# Altium PCB QuarterBridge_RevK.PcbDoc (part 2 of 2)
Units mil, origin at the board's own origin, x right, y up, seen from the top; angles counter-clockwise.
Board outline 3307.09 x 2165.35 mil, 2 copper layers (Top Layer, Bottom Layer), stack 62.992 mil thick; 54 components, 68 nets, 232 pads, 62 vias.
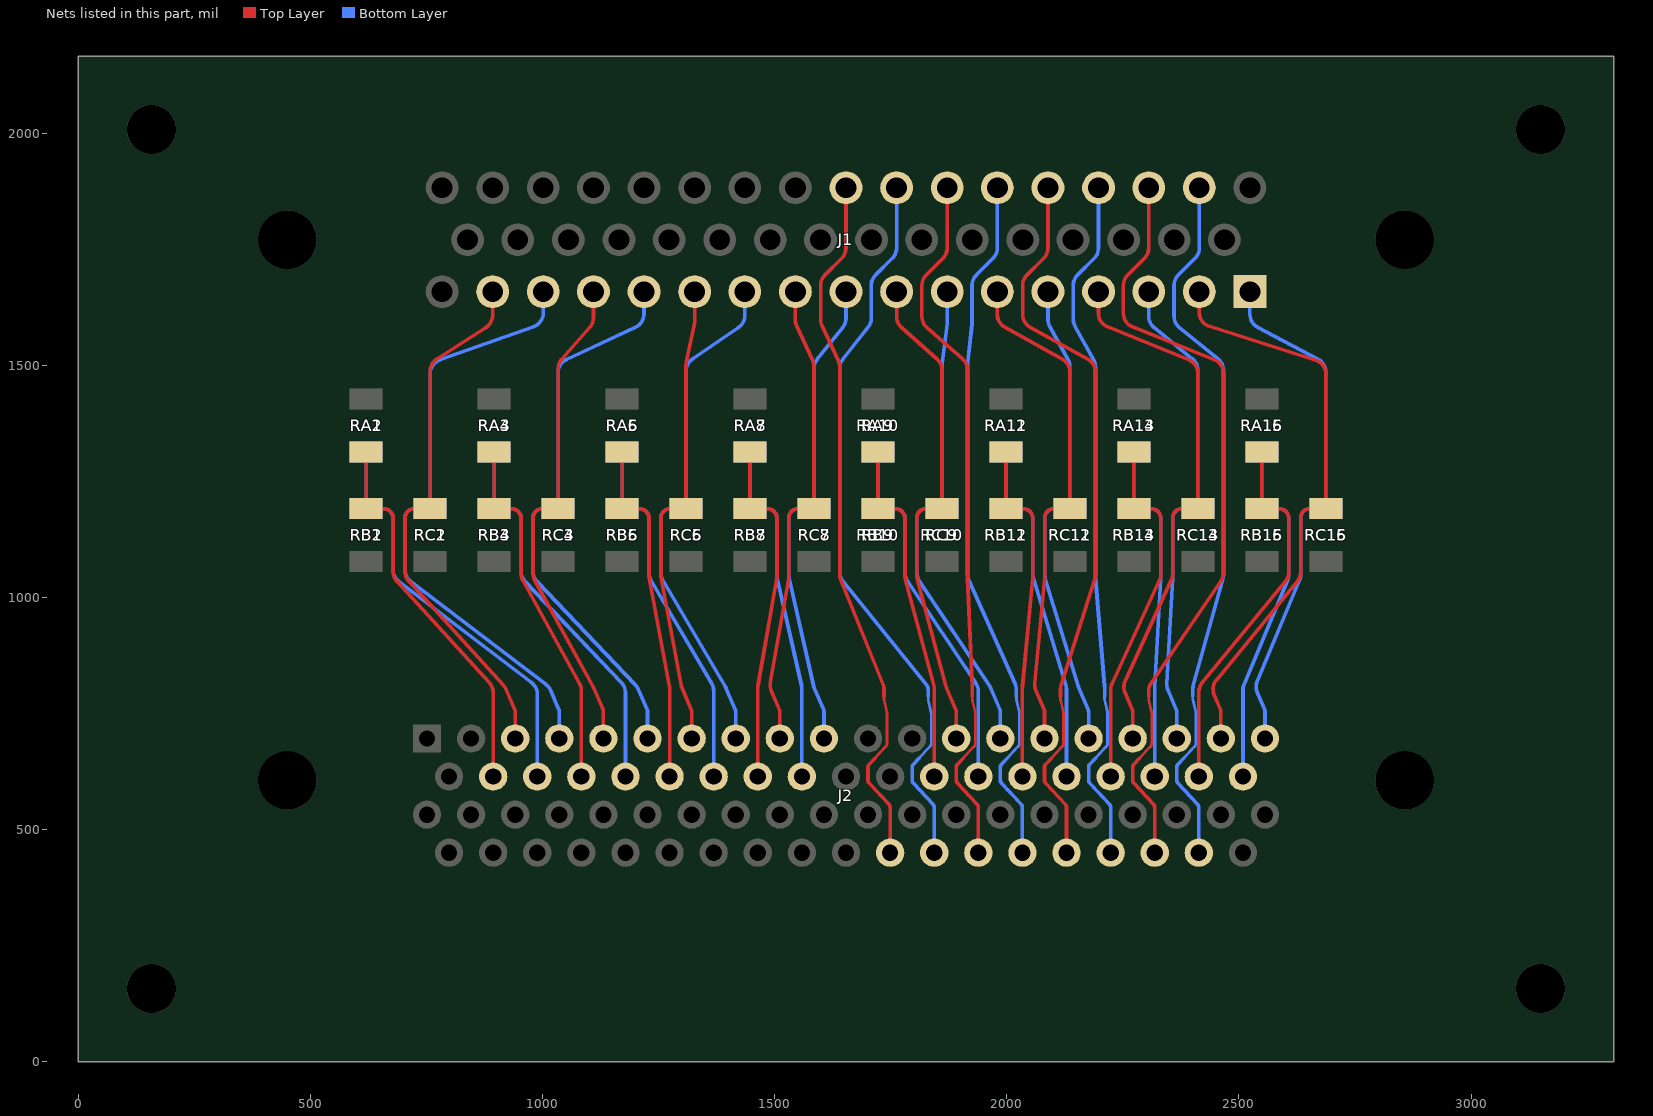
[diagram p2: the nets of this part, all layers, seen from the top]

## Via types
v1: diameter 23.62, hole 11.81, Top Layer to Bottom Layer, tented both sides, 58 vias
v2: diameter 19.68, hole 9.84, Top Layer to Bottom Layer, tented both sides, 4 vias

## Nets (pads, with @x,y where several pads share a name; then routed paths per layer and width w, separated by ;. In a path a pad name is that pad's centre, name@x,y a point inside that pad or via, vN(x,y) a via of type N, cw(c..) or ccw(c..) an arc to the next point about the centre after c; other vN are vias at no path point) (continued)
PS+_09: J1.42 J2.70 | length 1513.3
  Top Layer w5.91: 1715.9,653.54 1739.21,678.26 ccw(c1732.05,685.01) 1741.9,685.01 1741.9,750.85 ccw(c1732.05,750.85) 1741.65,753.06 1735.8,778.44 cw(c1745.39,780.65) 1735.55,780.65 1735.55,787.4
  Top Layer w7.87: J1.42@1653.54,1882.35 1653.54,1752.59 cw(c1622.05,1752.59) 1644.32,1730.31 1608.27,1694.26 ccw(c1630.54,1671.99) 1599.04,1671.99 1599.04,1597.59 ccw(c1630.54,1597.59) 1602.04,1584.19 1636.77,1510.3 cw(c1608.27,1496.9) 1639.76,1496.9 1639.76,1049.45 ccw(c1671.26,1049.45) 1642.07,1037.61 1733.24,812.78 cw(c1704.06,800.94) 1735.55,800.94 1735.55,787.4 ; 1715.9,653.54 1703.73,640.64 ccw(c1710.89,633.89) 1701.04,633.89 1701.04,606.23 ccw(c1710.89,606.23) 1703.67,599.53 1745.92,554.01 cw(c1738.7,547.32) 1748.54,547.32 J2.70@1748.54,450
PS+_10: J1.41 J2.71 | length 1574.4
  Bottom Layer w5.91: 1810.9,653.54 1834.21,678.26 ccw(c1827.05,685.01) 1836.9,685.01 1836.9,750.85 ccw(c1827.05,750.85) 1836.65,753.06 1830.8,778.44 cw(c1840.39,780.65) 1830.55,780.65 1830.55,787.4
  Bottom Layer w7.87: J1.41@1762.54,1882.35 1762.54,1752.59 cw(c1731.05,1752.59) 1753.32,1730.31 1717.27,1694.26 ccw(c1739.54,1671.99) 1708.04,1671.99 1708.04,1601.47 cw(c1676.55,1601.47) 1701.28,1581.97 1646.53,1512.51 ccw(c1671.26,1493.02) 1639.76,1493.02 1639.76,1054.44 ccw(c1671.26,1054.44) 1646.76,1034.65 1826.1,812.6 cw(c1810.5,800) 1830.55,800 1830.55,787.4 ; 1810.9,653.54 1798.73,640.64 ccw(c1805.89,633.89) 1796.04,633.89 1796.04,606.23 ccw(c1805.89,606.23) 1798.67,599.53 1840.92,554.01 cw(c1833.7,547.32) 1843.54,547.32 J2.71@1843.54,450
PS+_11: J1.40 J2.72 | length 1527.5
  Top Layer w5.91: 1905.9,653.54 1929.21,678.26 ccw(c1922.05,685.01) 1931.9,685.01 1931.9,750.85 ccw(c1922.05,750.85) 1931.65,753.06 1925.8,778.44 cw(c1935.39,780.65) 1925.55,780.65 1925.55,787.4
  Top Layer w7.87: J1.40@1871.54,1882.35 1871.54,1752.59 cw(c1840.05,1752.59) 1862.32,1730.31 1826.27,1694.26 ccw(c1848.54,1671.99) 1817.04,1671.99 1817.04,1604.78 ccw(c1848.54,1604.78) 1827.72,1581.15 1904.68,1513.34 cw(c1883.86,1489.71) 1915.35,1489.71 1915.35,1043.99 ccw(c1946.85,1043.99) 1915.38,1042.63 1925.52,807.77 cw(c1894.06,806.41) 1925.55,806.41 1925.55,787.4 ; 1905.9,653.54 1893.73,640.64 ccw(c1900.89,633.89) 1891.04,633.89 1891.04,606.23 ccw(c1900.89,606.23) 1893.67,599.53 1935.92,554.01 cw(c1928.7,547.32) 1938.54,547.32 J2.72@1938.54,450
PS+_12: J1.39 J2.73 | length 1508.8
  Bottom Layer w5.91: 2000.9,653.54 2024.21,678.26 ccw(c2017.05,685.01) 2026.9,685.01 2026.9,750.85 ccw(c2017.05,750.85) 2026.65,753.06 2020.8,778.44 cw(c2030.39,780.65) 2020.55,780.65 2020.55,787.4
  Bottom Layer w7.87: J1.39@1979.54,1882.35 1979.54,1752.59 cw(c1948.05,1752.59) 1970.32,1730.31 1934.27,1694.26 ccw(c1956.54,1671.99) 1925.04,1671.99 1925.04,1592.31 cw(c1893.55,1592.31) 1924.85,1588.81 1915.55,1505.68 ccw(c1946.85,1502.18) 1915.35,1502.18 1915.35,1050 ccw(c1946.85,1050) 1918.08,1037.19 2017.83,813.2 cw(c1989.06,800.39) 2020.55,800.39 2020.55,787.4 ; 2000.9,653.54 1988.73,640.64 ccw(c1995.89,633.89) 1986.04,633.89 1986.04,606.23 ccw(c1995.89,606.23) 1988.67,599.53 2030.92,554.01 cw(c2023.7,547.32) 2033.54,547.32 J2.73@2033.54,450
PS+_13: J1.38 J2.74 | length 1583.3
  Top Layer w5.91: 2095.9,653.54 2119.21,678.26 ccw(c2112.05,685.01) 2121.9,685.01 2121.9,750.85 ccw(c2112.05,750.85) 2121.65,753.06 2115.8,778.44 cw(c2125.39,780.65) 2115.55,780.65 2115.55,787.4
  Top Layer w7.87: J1.38@2088.54,1882.35 2088.54,1752.59 cw(c2057.05,1752.59) 2079.32,1730.31 2043.27,1694.26 ccw(c2065.54,1671.99) 2034.04,1671.99 2034.04,1609.14 ccw(c2065.54,1609.14) 2050.32,1581.57 2174.67,1512.92 cw(c2159.45,1485.35) 2190.94,1485.35 2190.94,1048.21 cw(c2159.45,1048.21) 2189.45,1038.63 2117.04,811.76 ccw(c2147.05,802.18) 2115.55,802.18 2115.55,787.4 ; 2095.9,653.54 2083.73,640.64 ccw(c2090.89,633.89) 2081.04,633.89 2081.04,606.23 ccw(c2090.89,606.23) 2083.67,599.53 2125.92,554.01 cw(c2118.7,547.32) 2128.54,547.32 J2.74@2128.54,450
PS+_14: J1.37 J2.75 | length 1498.8
  Bottom Layer w5.91: 2190.9,653.54 2214.21,678.26 ccw(c2207.05,685.01) 2216.9,685.01 2216.9,750.85 ccw(c2207.05,750.85) 2216.65,753.06 2210.8,778.44 cw(c2220.39,780.65) 2210.55,780.65 2210.55,787.4
  Bottom Layer w7.87: 2190.9,653.54 2178.73,640.64 ccw(c2185.89,633.89) 2176.04,633.89 2176.04,606.23 ccw(c2185.89,606.23) 2178.67,599.53 2220.92,554.01 cw(c2213.7,547.32) 2223.54,547.32 J2.75@2223.54,450 ; J1.37@2197.54,1882.35 2197.54,1752.59 cw(c2166.05,1752.59) 2188.32,1730.31 2152.27,1694.26 ccw(c2174.54,1671.99) 2143.04,1671.99 2143.04,1598.68 ccw(c2174.54,1598.68) 2146.98,1583.44 2187.01,1511.05 cw(c2159.45,1495.81) 2190.94,1495.81 2190.94,1044.61 ccw(c2222.44,1044.61) 2191.05,1042.01 2210.44,808.39 cw(c2179.06,805.78) 2210.55,805.78 2210.55,787.4
PS+_15: J1.36 J2.76 | length 1670.3
  Top Layer w5.91: 2285.9,653.54 2309.21,678.26 ccw(c2302.05,685.01) 2311.9,685.01 2311.9,750.85 ccw(c2302.05,750.85) 2311.65,753.06 2305.8,778.44 cw(c2315.39,780.65) 2305.55,780.65 2305.55,787.4
  Top Layer w7.87: 2285.9,653.54 2273.73,640.64 ccw(c2280.89,633.89) 2271.04,633.89 2271.04,606.23 ccw(c2280.89,606.23) 2273.67,599.53 2315.92,554.01 cw(c2308.7,547.32) 2318.54,547.32 J2.76@2318.54,450 ; 2305.55,787.4 2305.55,800 cw(c2328.53,800) 2309.54,812.94 2461.07,1035.28 ccw(c2435.04,1053.02) 2466.54,1053.02 2466.54,1482.65 ccw(c2435.04,1482.65) 2446.79,1511.88 2270.79,1582.61 cw(c2282.54,1611.84) 2251.04,1611.84 2251.04,1671.99 cw(c2282.54,1671.99) 2260.27,1694.26 2296.32,1730.31 ccw(c2274.05,1752.59) 2305.54,1752.59 J1.36@2305.54,1882.35
PS+_16: J1.35 J2.77 | length 1541.9
  Bottom Layer w5.91: 2380.9,653.54 2404.21,678.26 ccw(c2397.05,685.01) 2406.9,685.01 2406.9,750.85 ccw(c2397.05,750.85) 2406.65,753.06 2400.8,778.44 cw(c2410.39,780.65) 2400.55,780.65 2400.55,787.4
  Bottom Layer w7.87: 2380.9,653.54 2368.73,640.64 ccw(c2375.89,633.89) 2366.04,633.89 2366.04,606.23 ccw(c2375.89,606.23) 2368.67,599.53 2410.92,554.01 cw(c2403.7,547.32) 2413.54,547.32 J2.77@2413.54,450 ; 2400.55,787.4 2400.55,802.77 cw(c2432.05,802.77) 2401.71,811.24 2465.37,1039.15 ccw(c2435.04,1047.62) 2466.54,1047.62 2466.54,1488.96 ccw(c2435.04,1488.96) 2454.91,1513.39 2371.67,1581.1 cw(c2391.54,1605.53) 2360.04,1605.53 2360.04,1671.99 cw(c2391.54,1671.99) 2369.27,1694.26 2405.32,1730.31 ccw(c2383.05,1752.59) 2414.54,1752.59 J1.35@2414.54,1882.35
S+_01: J1.16 J2.3 RC1.2 | length 1162.5
  Top Layer w7.87: J1.16@892.54,1658.35 892.54,1607.74 cw(c861.05,1607.74) 878.08,1581.25 772.33,1513.24 ccw(c789.37,1486.75) 757.87,1486.75 RC1.2@757.87,1190.94 723.23,1190.94 ccw(c723.23,1171.46) 703.74,1171.46 703.74,1055.51 ccw(c735.24,1055.51) 711.96,1034.29 915.55,811.02 cw(c892.27,789.8) 921.23,802.19 940.25,757.76 cw(c931.2,753.89) 941.04,753.89 J2.3@941.04,696
S+_02: J1.15 J2.4 RC2.2 | length 1324.3
  Bottom Layer w7.87: J1.15@1001.54,1658.35 1001.54,1612.78 cw(c970.05,1612.78) 980.6,1583.11 778.82,1511.38 ccw(c789.37,1481.71) 757.87,1481.71 RC2.2@757.87,1190.94 723.23,1190.94 ccw(c723.23,1171.46) 703.74,1171.46 703.74,1058.92 ccw(c735.24,1058.92) 716.16,1033.85 1007.52,812.12 cw(c988.45,787.05) 1017.4,799.45 1035.25,757.76 cw(c1026.2,753.89) 1036.04,753.89 J2.4@1036.04,696
S+_03: J1.14 J2.5 RC3.2 | length 1072.1
  Top Layer w7.87: J1.14@1109.54,1658.35 1109.54,1602.42 cw(c1078.05,1602.42) 1101.71,1581.63 1041.3,1512.85 ccw(c1064.96,1492.07) 1033.46,1492.07 RC3.2@1033.46,1190.94 998.82,1190.94 ccw(c998.82,1171.46) 979.33,1171.46 979.33,1051.39 ccw(c1010.83,1051.39) 983.22,1036.22 1108.39,808.44 cw(c1080.79,793.27) 1109.74,805.67 1130.25,757.76 cw(c1121.2,753.89) 1131.04,753.89 J2.5@1131.04,696
S+_04: J1.13 J2.6 RC4.2 | length 1210.1
  Bottom Layer w7.87: J1.13@1218.54,1658.35 1218.54,1610.59 cw(c1187.05,1610.59) 1200.4,1582.06 1051.61,1512.43 ccw(c1064.96,1483.9) 1033.46,1483.9 RC4.2@1033.46,1190.94 998.82,1190.94 ccw(c998.82,1171.46) 979.33,1171.46 979.33,1055.9 ccw(c1010.83,1055.9) 988.01,1034.19 1200.23,811.19 cw(c1177.41,789.48) 1206.36,801.88 1225.25,757.76 cw(c1216.2,753.89) 1226.04,753.89 J2.6@1226.04,696
S+_05: J1.12 J2.7 RC5.2 | length 1018.5
  Top Layer w7.87: J2.7@1321.04,696 1321.04,753.89 ccw(c1311.2,753.89) 1320.25,757.76 1300.5,803.9 cw(c1329.45,816.29) 1298.5,810.5 1255.46,1040.43 cw(c1286.42,1046.23) 1254.92,1046.23 1254.92,1171.46 cw(c1274.41,1171.46) 1274.41,1190.94 RC5.2@1309.06,1190.94 1309.06,1500.61 cw(c1340.55,1500.61) 1309.75,1507.19 1326.85,1587.3 ccw(c1296.05,1593.88) 1327.54,1593.88 J1.12@1327.54,1658.35
S+_06: J1.11 J2.8 RC6.2 | length 1111.5
  Bottom Layer w7.87: J2.8@1416.04,696 1416.04,753.89 ccw(c1406.2,753.89) 1415.25,757.76 1394.93,805.23 ccw(c1365.97,792.84) 1393.11,808.83 1259.28,1035.91 cw(c1286.42,1051.9) 1254.92,1051.9 1254.92,1171.46 cw(c1274.41,1171.46) 1274.41,1190.94 RC6.2@1309.06,1190.94 1309.06,1487.33 cw(c1340.55,1487.33) 1322.76,1513.32 1421.84,1581.17 ccw(c1404.05,1607.16) 1435.54,1607.16 J1.11@1435.54,1658.35
S+_07: J1.10 J2.9 RC7.2 | length 1024
  Top Layer w7.87: J2.9@1511.04,696 1511.04,753.89 ccw(c1501.2,753.89) 1510.25,757.76 1492.82,798.48 cw(c1521.77,810.87) 1490.75,816.31 1530.04,1040.61 ccw(c1499.02,1046.04) 1530.51,1046.04 1530.51,1171.46 cw(c1550,1171.46) 1550,1190.94 RC7.2@1584.65,1190.94 1584.65,1497 ccw(c1553.15,1497) 1581.73,1510.23 1547.46,1584.26 cw(c1576.04,1597.49) 1544.54,1597.49 J1.10@1544.54,1658.35
S+_08: J1.9 J2.10 RC8.2 | length 1040.9
  Bottom Layer w7.87: J2.10@1606.04,696 1606.04,753.89 ccw(c1596.2,753.89) 1605.25,757.76 1585.26,804.46 cw(c1614.21,816.85) 1583.5,809.88 1531.29,1039.86 cw(c1562.01,1046.84) 1530.51,1046.84 1530.51,1171.46 cw(c1550,1171.46) 1550,1190.94 RC8.2@1584.65,1190.94 1584.65,1492.94 cw(c1616.14,1492.94) 1591.49,1512.54 1646.7,1581.94 ccw(c1622.05,1601.55) 1653.54,1601.55 J1.9@1653.54,1658.35
S+_09: J1.8 J2.13 RC9.2 | length 1061.3
  Top Layer w7.87: J1.8@1762.54,1658.35 1762.54,1604.72 ccw(c1794.04,1604.72) 1773.14,1581.15 1849.63,1513.34 cw(c1828.74,1489.77) 1860.24,1489.77 RC9.2@1860.24,1190.94 1825.59,1190.94 ccw(c1825.59,1171.46) 1806.1,1171.46 1806.1,1047.44 ccw(c1837.6,1047.44) 1807.17,1039.32 1868.55,809.28 ccw(c1898.98,817.4) 1870.03,805 1890.25,757.76 cw(c1881.2,753.89) 1891.04,753.89 J2.13@1891.04,696
S+_10: J1.7 J2.14 RC10.2 | length 1060.7
  Bottom Layer w7.87: J1.7@1871.54,1658.35 1871.54,1592.6 cw(c1840.05,1592.6) 1871.28,1588.52 1860.5,1505.97 ccw(c1891.73,1501.89) 1860.24,1501.89 RC10.2@1860.24,1190.94 1825.59,1190.94 ccw(c1825.59,1171.46) 1806.1,1171.46 1806.1,1052.87 ccw(c1837.6,1052.87) 1811.42,1035.36 1962.51,809.52 cw(c1936.33,792) 1965.28,804.4 1985.25,757.76 cw(c1976.2,753.89) 1986.04,753.89 J2.14@1986.04,696
S+_11: J1.6 J2.15 RC11.2 | length 1098.2
  Top Layer w7.87: J1.6@1979.54,1658.35 1979.54,1609.11 ccw(c2011.04,1609.11) 1995.77,1581.56 2119.6,1512.93 cw(c2104.33,1485.38) 2135.83,1485.38 RC11.2@2135.83,1190.94 2101.18,1190.94 ccw(c2101.18,1171.46) 2081.69,1171.46 2081.69,1044.81 cw(c2050.2,1044.81) 2081.55,1041.81 2059.9,815.09 ccw(c2091.25,812.09) 2062.3,799.7 2080.25,757.76 cw(c2071.2,753.89) 2081.04,753.89 J2.15@2081.04,696
S+_12: J1.5 J2.16 RC12.2 | length 1034.7
  Bottom Layer w7.87: J1.5@2088.54,1658.35 2088.54,1598.59 ccw(c2120.04,1598.59) 2092.39,1583.5 2131.98,1510.99 cw(c2104.33,1495.9) 2135.83,1495.9 RC12.2@2135.83,1190.94 2101.18,1190.94 ccw(c2101.18,1171.46) 2081.69,1171.46 2081.69,1048.03 ccw(c2113.19,1048.03) 2083.08,1038.79 2153.64,808.7 ccw(c2183.75,817.93) 2154.8,805.54 2175.25,757.76 cw(c2166.2,753.89) 2176.04,753.89 J2.16@2176.04,696
S+_13: J1.4 J2.17 RC13.2 | length 1168.2
  Top Layer w7.87: J1.4@2197.54,1658.35 2197.54,1611.78 ccw(c2229.04,1611.78) 2217.22,1582.58 2391.74,1511.9 cw(c2379.92,1482.71) 2411.42,1482.71 RC13.2@2411.42,1190.94 2376.77,1190.94 ccw(c2376.77,1171.46) 2357.28,1171.46 2357.28,1050.17 cw(c2325.79,1050.17) 2354.42,1037.06 2254.94,819.77 ccw(c2283.58,806.66) 2254.62,794.26 2270.25,757.76 cw(c2261.2,753.89) 2271.04,753.89 J2.17@2271.04,696
S+_14: J1.3 J2.18 RC14.2 | length 1058.9
  Bottom Layer w7.87: J1.3@2305.54,1658.35 2305.54,1605.48 ccw(c2337.04,1605.48) 2317.1,1581.1 2399.86,1513.39 cw(c2379.92,1489.01) 2411.42,1489.01 RC14.2@2411.42,1190.94 2376.77,1190.94 ccw(c2376.77,1171.46) 2357.28,1171.46 2357.28,1044.18 cw(c2325.79,1044.18) 2357.23,1042.43 2344.54,814.45 ccw(c2375.99,812.7) 2347.04,800.31 2365.25,757.76 cw(c2356.2,753.89) 2366.04,753.89 J2.18@2366.04,696
S+_15: J1.2 J2.19 RC15.2 | length 1263.8
  Top Layer w7.87: J1.2@2414.54,1658.35 2414.54,1613.59 ccw(c2446.04,1613.59) 2436.5,1583.57 2665.05,1510.92 cw(c2655.51,1480.9) 2687.01,1480.9 RC15.2@2687.01,1190.94 2652.36,1190.94 ccw(c2652.36,1171.46) 2632.87,1171.46 2632.87,1054.57 cw(c2601.38,1054.57) 2625.73,1034.6 2451.26,821.87 ccw(c2475.61,801.9) 2446.66,789.51 2460.25,757.76 cw(c2451.2,753.89) 2461.04,753.89 J2.19@2461.04,696
S+_16: J1.1 J2.20 RC16.2 | length 1121.6
  Bottom Layer w7.87: J1.1@2523.54,1658.35 2523.54,1609.51 ccw(c2555.04,1609.51) 2540.29,1581.68 2670.26,1512.81 cw(c2655.51,1484.98) 2687.01,1484.98 RC16.2@2687.01,1190.94 2652.36,1190.94 ccw(c2652.36,1171.46) 2632.87,1171.46 2632.87,1049.62 cw(c2601.38,1049.62) 2630.44,1037.48 2539.27,819.38 ccw(c2568.33,807.23) 2539.38,794.84 2555.25,757.76 cw(c2546.2,753.89) 2556.04,753.89 J2.20@2556.04,696
S-_01: J2.22 RA1.2 RB1.1 | length 829.3
  Top Layer w7.87: RA1.2@620.08,1312.99 RB1.1@620.08,1190.94 657.24,1190.94 cw(c657.24,1170.04) 678.15,1170.04 678.15,1055.51 ccw(c709.65,1055.51) 686.37,1034.29 885.32,816.1 cw(c862.05,794.88) 893.54,794.88 J2.22@893.54,614
S-_02: J2.23 RA2.2 RB2.1 | length 897.5
  Bottom Layer w7.87: RA2.2@620.08,1312.99 RB2.1@620.08,1190.94 657.24,1190.94 cw(c657.24,1170.04) 678.15,1170.04 678.15,1058.92 ccw(c709.65,1058.92) 690.57,1033.85 976.12,816.54 cw(c957.05,791.48) 988.54,791.48 J2.23@988.54,614
S-_03: J2.24 RA3.2 RB3.1 | length 780.7
  Top Layer w7.87: RA3.2@895.67,1312.99 RB3.1@895.67,1190.94 932.83,1190.94 cw(c932.83,1170.04) 953.74,1170.04 953.74,1051.39 ccw(c985.24,1051.39) 957.63,1036.22 1079.65,814.17 cw(c1052.05,799) 1083.54,799 J2.24@1083.54,614
S-_04: J2.25 RA4.2 RB4.1 | length 835.5
  Bottom Layer w7.87: RA4.2@895.67,1312.99 RB4.1@895.67,1190.94 932.83,1190.94 cw(c932.83,1170.04) 953.74,1170.04 953.74,1055.9 ccw(c985.24,1055.9) 962.42,1034.19 1169.86,816.21 cw(c1147.05,794.5) 1178.54,794.5 J2.25@1178.54,614
S-_05: J2.26 RA5.2 RB5.1 | length 752.2
  Top Layer w7.87: RA5.2@1171.26,1312.99 RB5.1@1171.26,1190.94 1208.43,1190.94 cw(c1208.43,1170.04) 1229.33,1170.04 1229.33,1046.23 ccw(c1260.83,1046.23) 1229.87,1040.43 1273.01,809.96 cw(c1242.05,804.16) 1273.54,804.16 J2.26@1273.54,614
S-_06: J2.27 RA6.2 RB6.1 | length 785.2
  Bottom Layer w7.87: RA6.2@1171.26,1312.99 RB6.1@1171.26,1190.94 1208.43,1190.94 cw(c1208.43,1170.04) 1229.33,1170.04 1229.33,1051.9 ccw(c1260.83,1051.9) 1233.69,1035.91 1364.18,814.49 cw(c1337.05,798.5) 1368.54,798.5 J2.27@1368.54,614
S-_07: J2.28 RA7.2 RB7.1 | length 751.7
  Top Layer w7.87: RA7.2@1446.85,1312.99 RB7.1@1446.85,1190.94 1484.02,1190.94 cw(c1484.02,1170.04) 1504.92,1170.04 1504.92,1046.04 cw(c1473.43,1046.04) 1504.45,1040.61 1464.02,809.78 ccw(c1495.04,804.35) 1463.54,804.35 J2.28@1463.54,614
S-_08: J2.29 RA8.2 RB8.1 | length 754
  Bottom Layer w7.87: RA8.2@1446.85,1312.99 RB8.1@1446.85,1190.94 1484.02,1190.94 cw(c1484.02,1170.04) 1504.92,1170.04 1504.92,1046.84 ccw(c1536.42,1046.84) 1505.7,1039.86 1557.76,810.53 cw(c1527.05,803.56) 1558.54,803.56 J2.29@1558.54,614
S-_09: J2.32 RA9.2 RB9.1 | length 756.3
  Top Layer w7.87: RA9.2@1722.44,1312.99 RB9.1@1722.44,1190.94 1759.61,1190.94 cw(c1759.61,1170.04) 1780.51,1170.04 1780.51,1047.44 ccw(c1812.01,1047.44) 1781.58,1039.32 1842.48,811.08 cw(c1812.05,802.96) 1843.54,802.96 J2.32@1843.54,614
S-_10: J2.33 RA10.2 RB10.1 | length 795
  Bottom Layer w7.87: RA10.2@1722.44,1312.99 RB10.1@1722.44,1190.94 1759.61,1190.94 cw(c1759.61,1170.04) 1780.51,1170.04 1780.51,1052.87 ccw(c1812.01,1052.87) 1785.83,1035.36 1933.23,815.04 cw(c1907.05,797.52) 1938.54,797.52 J2.33@1938.54,614
S-_11: J2.34 RA11.2 RB11.1 | length 749.2
  Top Layer w7.87: RA11.2@1998.03,1312.99 RB11.1@1998.03,1190.94 2035.2,1190.94 cw(c2035.2,1170.04) 2056.1,1170.04 2056.1,1044.81 cw(c2024.61,1044.81) 2055.96,1041.81 2033.69,808.58 ccw(c2065.04,805.59) 2033.54,805.59 J2.34@2033.54,614
S-_12: J2.35 RA12.2 RB12.1 | length 758.8
  Bottom Layer w7.87: RA12.2@1998.03,1312.99 RB12.1@1998.03,1190.94 2035.2,1190.94 cw(c2035.2,1170.04) 2056.1,1170.04 2056.1,1048.03 ccw(c2087.6,1048.03) 2057.49,1038.79 2127.16,811.6 cw(c2097.05,802.37) 2128.54,802.37 J2.35@2128.54,614
S-_13: J2.36 RA13.2 RB13.1 | length 771.2
  Top Layer w7.87: J2.36@2223.54,614 2223.54,800.22 cw(c2255.04,800.22) 2226.4,813.33 2328.83,1037.06 ccw(c2300.2,1050.17) 2331.69,1050.17 2331.69,1170.04 ccw(c2310.79,1170.04) 2310.79,1190.94 RB13.1@2273.62,1190.94 RA13.2@2273.62,1312.99
S-_14: J2.37 RA14.2 RB14.1 | length 748.5
  Bottom Layer w7.87: RA14.2@2273.62,1312.99 RB14.1@2273.62,1190.94 2310.79,1190.94 cw(c2310.79,1170.04) 2331.69,1170.04 2331.69,1044.18 cw(c2300.2,1044.18) 2331.64,1042.43 2318.59,807.96 ccw(c2350.04,806.21) 2318.54,806.21 J2.37@2318.54,614
S-_15: J2.38 RA15.2 RB15.1 | length 815.6
  Top Layer w7.87: J2.38@2413.54,614 2413.54,795.82 cw(c2445.04,795.82) 2420.69,815.8 2600.14,1034.6 ccw(c2575.79,1054.57) 2607.28,1054.57 2607.28,1170.04 ccw(c2586.38,1170.04) 2586.38,1190.94 RB15.1@2549.21,1190.94 RA15.2@2549.21,1312.99
S-_16: J2.39 RA16.2 RB16.1 | length 767.6
  Bottom Layer w7.87: J2.39@2508.54,614 2508.54,800.77 cw(c2540.04,800.77) 2510.98,812.92 2604.85,1037.48 ccw(c2575.79,1049.62) 2607.28,1049.62 2607.28,1170.04 ccw(c2586.38,1170.04) 2586.38,1190.94 RB16.1@2549.21,1190.94 RA16.2@2549.21,1312.99
pads on no net: H1. H2. H3. H4. J1. J2.

## Polygon pours and split planes (outlines as drawn)
AGND_B on Top Layer "QB_AGND_B_TopLayer" (solid, remove dead copper, pour order 5): 1615.89,11.81 1615.89,450 1663.39,532 1710.89,614 1663.39,696 1663.39,2153.54 3295.28,2153.54 3295.28,11.81
AGND_A on Top Layer "QB_AGND_A_TopLayer" (solid, remove dead copper, pour order 3): 11.81,11.81 1596.2,11.81 1596.2,450 1643.7,532 1691.2,614 1643.7,696 1643.7,2153.54 11.81,2153.54
AGND_B on Bottom Layer "QB_AGND_B_BottomLayer" (solid, remove dead copper, pour order 4): 1615.89,11.81 1615.89,450 1663.39,532 1710.89,614 1663.39,696 1663.39,2153.54 3295.28,2153.54 3295.28,11.81
AGND_A on Bottom Layer "QB_AGND_A_BottomLayer" (solid, remove dead copper, pour order 2): 11.81,11.81 1596.2,11.81 1596.2,450 1643.7,532 1691.2,614 1643.7,696 1643.7,2153.54 11.81,2153.54

## Keep-outs
Keep-Out Layer:
  region: 3266.71,1992.46 3267.72,2007.87 3266.71,2023.29 3263.69,2038.44 3258.73,2053.07 3251.89,2066.93 3243.31,2079.78 3233.12,2091.39 3221.51,2101.58 3208.66,2110.16 3194.81,2116.99 3180.18,2121.96 3165.02,2124.97 3149.61,2125.98 3134.19,2124.97 3119.04,2121.96 3104.41,2116.99 3090.55,2110.16 3077.71,2101.58 3066.09,2091.39 3055.9,2079.78 3047.32,2066.93 3040.49,2053.07 3035.52,2038.44 3032.51,2023.29 3031.5,2007.87 3032.51,1992.46 3035.52,1977.3 3040.49,1962.68 3047.32,1948.82 3055.9,1935.97 3066.09,1924.36 3077.71,1914.17 3090.55,1905.59 3104.41,1898.75 3119.04,1893.79 3134.19,1890.77 3149.61,1889.76 3165.02,1890.77 3180.18,1893.79 3194.81,1898.75 3208.66,1905.59 3221.51,1914.17 3233.12,1924.36 3243.31,1935.97 3251.89,1948.82 3258.73,1962.68 3263.69,1977.3
  region: 274.58,1992.46 275.59,2007.87 274.58,2023.29 271.57,2038.44 266.6,2053.07 259.77,2066.93 251.18,2079.78 241,2091.39 229.38,2101.58 216.54,2110.16 202.68,2116.99 188.05,2121.96 172.9,2124.97 157.48,2125.98 142.06,2124.97 126.91,2121.96 112.28,2116.99 98.43,2110.16 85.58,2101.58 73.96,2091.39 63.78,2079.78 55.19,2066.93 48.36,2053.07 43.39,2038.44 40.38,2023.29 39.37,2007.87 40.38,1992.46 43.39,1977.3 48.36,1962.68 55.19,1948.82 63.78,1935.97 73.96,1924.36 85.58,1914.17 98.43,1905.59 112.28,1898.75 126.91,1893.79 142.06,1890.77 157.48,1889.76 172.9,1890.77 188.05,1893.79 202.68,1898.75 216.54,1905.59 229.38,1914.17 241,1924.36 251.18,1935.97 259.77,1948.82 266.6,1962.68 271.57,1977.3
  region: 3266.71,142.06 3267.72,157.48 3266.71,172.9 3263.69,188.05 3258.73,202.68 3251.89,216.54 3243.31,229.38 3233.12,241 3221.51,251.18 3208.66,259.77 3194.81,266.6 3180.18,271.57 3165.02,274.58 3149.61,275.59 3134.19,274.58 3119.04,271.57 3104.41,266.6 3090.55,259.77 3077.71,251.18 3066.09,241 3055.9,229.38 3047.32,216.54 3040.49,202.68 3035.52,188.05 3032.51,172.9 3031.5,157.48 3032.51,142.06 3035.52,126.91 3040.49,112.28 3047.32,98.43 3055.9,85.58 3066.09,73.96 3077.71,63.78 3090.55,55.19 3104.41,48.36 3119.04,43.39 3134.19,40.38 3149.61,39.37 3165.02,40.38 3180.18,43.39 3194.81,48.36 3208.66,55.19 3221.51,63.78 3233.12,73.96 3243.31,85.58 3251.89,98.43 3258.73,112.28 3263.69,126.91
  region: 274.58,142.06 275.59,157.48 274.58,172.9 271.57,188.05 266.6,202.68 259.77,216.54 251.18,229.38 241,241 229.38,251.18 216.54,259.77 202.68,266.6 188.05,271.57 172.9,274.58 157.48,275.59 142.06,274.58 126.91,271.57 112.28,266.6 98.43,259.77 85.58,251.18 73.96,241 63.78,229.38 55.19,216.54 48.36,202.68 43.39,188.05 40.38,172.9 39.37,157.48 40.38,142.06 43.39,126.91 48.36,112.28 55.19,98.43 63.78,85.58 73.96,73.96 85.58,63.78 98.43,55.19 112.28,48.36 126.91,43.39 142.06,40.38 157.48,39.37 172.9,40.38 188.05,43.39 202.68,48.36 216.54,55.19 229.38,63.78 241,73.96 251.18,85.58 259.77,98.43 266.6,112.28 271.57,126.91
  region: 567.64,590.58 568.65,606 567.64,621.42 564.63,636.57 559.66,651.2 552.83,665.06 544.25,677.9 534.06,689.52 522.44,699.7 509.6,708.29 495.74,715.12 481.11,720.09 465.96,723.1 450.54,724.11 435.13,723.1 419.97,720.09 405.34,715.12 391.49,708.29 378.64,699.7 367.03,689.52 356.84,677.9 348.26,665.06 341.42,651.2 336.46,636.57 333.44,621.42 332.43,606 333.44,590.58 336.46,575.43 341.42,560.8 348.26,546.94 356.84,534.1 367.03,522.48 378.64,512.3 391.49,503.71 405.34,496.88 419.97,491.91 435.13,488.9 450.54,487.89 465.96,488.9 481.11,491.91 495.74,496.88 509.6,503.71 522.44,512.3 534.06,522.48 544.25,534.1 552.83,546.94 559.66,560.8 564.63,575.43
  region: 2973.64,590.58 2974.65,606 2973.64,621.42 2970.63,636.57 2965.66,651.2 2958.83,665.06 2950.25,677.9 2940.06,689.52 2928.44,699.7 2915.6,708.29 2901.74,715.12 2887.11,720.09 2871.96,723.1 2856.54,724.11 2841.13,723.1 2825.97,720.09 2811.34,715.12 2797.49,708.29 2784.64,699.7 2773.03,689.52 2762.84,677.9 2754.26,665.06 2747.42,651.2 2742.46,636.57 2739.44,621.42 2738.43,606 2739.44,590.58 2742.46,575.43 2747.42,560.8 2754.26,546.94 2762.84,534.1 2773.03,522.48 2784.64,512.3 2797.49,503.71 2811.34,496.88 2825.97,491.91 2841.13,488.9 2856.54,487.89 2871.96,488.9 2887.11,491.91 2901.74,496.88 2915.6,503.71 2928.44,512.3 2940.06,522.48 2950.25,534.1 2958.83,546.94 2965.66,560.8 2970.63,575.43
  region: 2973.64,1754.94 2974.65,1770.35 2973.64,1785.77 2970.63,1800.92 2965.66,1815.55 2958.83,1829.41 2950.25,1842.26 2940.06,1853.87 2928.44,1864.06 2915.6,1872.64 2901.74,1879.47 2887.11,1884.44 2871.96,1887.45 2856.54,1888.46 2841.13,1887.45 2825.97,1884.44 2811.34,1879.47 2797.49,1872.64 2784.64,1864.06 2773.03,1853.87 2762.84,1842.26 2754.26,1829.41 2747.42,1815.55 2742.46,1800.92 2739.44,1785.77 2738.43,1770.35 2739.44,1754.94 2742.46,1739.79 2747.42,1725.16 2754.26,1711.3 2762.84,1698.45 2773.03,1686.84 2784.64,1676.65 2797.49,1668.07 2811.34,1661.23 2825.97,1656.27 2841.13,1653.25 2856.54,1652.24 2871.96,1653.25 2887.11,1656.27 2901.74,1661.23 2915.6,1668.07 2928.44,1676.65 2940.06,1686.84 2950.25,1698.45 2958.83,1711.3 2965.66,1725.16 2970.63,1739.79
  region: 567.64,1754.94 568.65,1770.35 567.64,1785.77 564.63,1800.92 559.66,1815.55 552.83,1829.41 544.25,1842.26 534.06,1853.87 522.44,1864.06 509.6,1872.64 495.74,1879.47 481.11,1884.44 465.96,1887.45 450.54,1888.46 435.13,1887.45 419.97,1884.44 405.34,1879.47 391.49,1872.64 378.64,1864.06 367.03,1853.87 356.84,1842.26 348.26,1829.41 341.42,1815.55 336.46,1800.92 333.44,1785.77 332.43,1770.35 333.44,1754.94 336.46,1739.79 341.42,1725.16 348.26,1711.3 356.84,1698.45 367.03,1686.84 378.64,1676.65 391.49,1668.07 405.34,1661.23 419.97,1656.27 435.13,1653.25 450.54,1652.24 465.96,1653.25 481.11,1656.27 495.74,1661.23 509.6,1668.07 522.44,1676.65 534.06,1686.84 544.25,1698.45 552.83,1711.3 559.66,1725.16 564.63,1739.79